# Altium PCB NB2DSK01.PcbDoc (part 4 of 17)
Units mil, origin at the board's own origin, x right, y up, seen from the top; angles counter-clockwise.
Board outline 11815 x 6500.03 mil, 8 copper layers (Top Layer, MidLayer1, MidLayer2, GND, PWR, MidLayer3, MidLayer4, Bottom Layer), stack 74.62 mil thick; 798 components, 1002 nets, 3927 pads, 3182 vias.
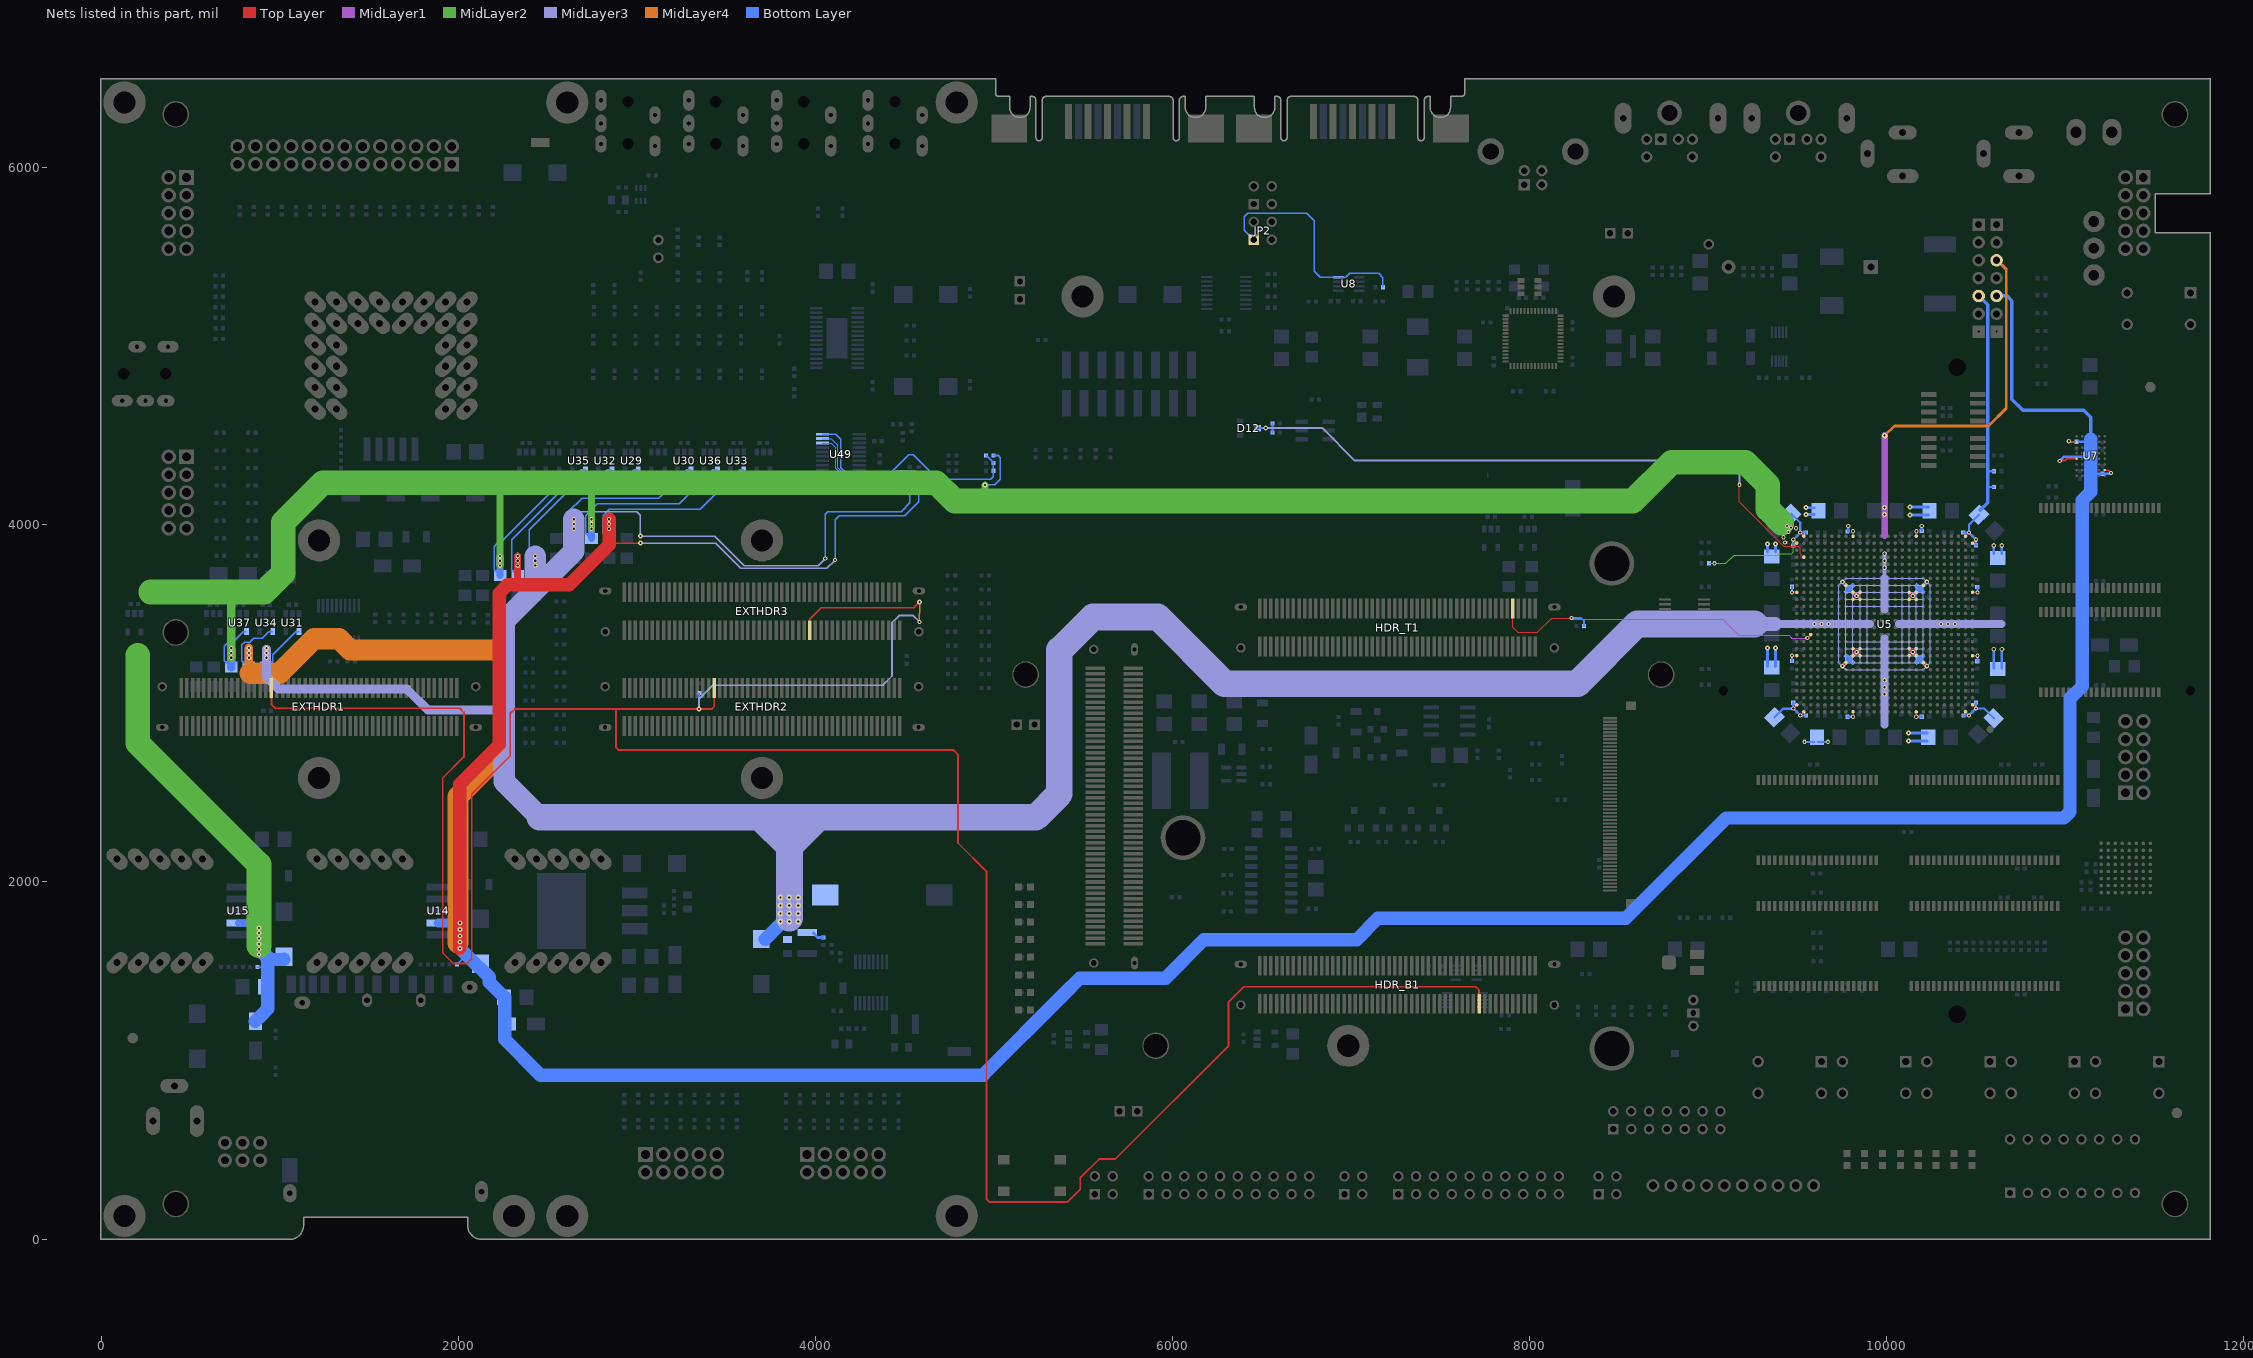
[diagram p10: the nets of this part, all layers, seen from the top]

## Part data
"Altium Logo BOT1" "Altium Logo Top1": library part D-000-0003, "Altium Logo for PCB"
BT1: library part D-302-0000, "Lithium Battery Holder for CR2032 3V Cell"
C1 C2 C3 C4 C137 C150 C160 C164 C168 C177 C180: library part D-101-0088, "Capacitor, Tantalum, 220uF 10% 10V MCCT-D (7343-31)"
C5 C6 C7 C8 C118: library part D-101-0078, "Capacitor, Ceramic, 100pF 5% 50V 0402 (1005) COG"
C9 C11 C14 C17 C26 C27 C28 C29 C38 C39 C40 C41 C42 C58 C59 C60 C61 C62 C63 C64 C65 C66 C67 C68 C69 C70 C71 C72 C73 C74 C75 C76 C77 C78 C79 C80 C81 C82 C83 C84 C115 C117 C119 C120 C121 C122 C125 C126 C127 C129 C134 C141 C153 C154 C155 C156 C174 C194 C195 C196 C198 C200 C202 C203 C204 C205 C206 C211 C212 C216 C219 C220 C221 C222 C227 C228 C229 C230 C235 C236 C237 C238 C239 C240 C241 C242 C243 C244 C245 C246 C247 C248 C249 C250 C251 C252 C253 C254 C255 C256 C257 C258 C259 C260 C261 C262 C263 C264 C265 C267 C268 C272: library part D-101-0080, "Capacitor, Ceramic, 0.1uF 10% 16V 0402 (1005) X7R"
C10 C15 C16 C18 C19 C20 C21 C22 C23 C24 C25 C34 C35 C36 C37 C54 C55 C56 C57 C114 C116 C123 C124 C132 C133 C135 C136 C140 C143 C158 C159 C162 C163 C166 C167 C169 C170 C193 C217 C218 C266 C273: library part D-101-0007, "Capacitor, Tantalum, 10uF 10% 20V MCCT-B (3528)"
C12 C13: library part D-101-0075, "Capacitor, Ceramic, 15pF 5% 50V 0402 (1005)"
C30 C31 C32 C33 C43 C44 C45 C46 C47 C48 C49 C50 C51 C52 C53 C85 C86 C87 C88 C89 C90 C91 C92 C93 C94 C95 C96 C97 C98 C99 C100 C101 C102 C103 C104 C105 C106 C107 C108 C109 C110 C111 C112 C113 C199 C201 C207 C208 C209 C210 C213 C214 C215 C223 C224 C225 C226 C231 C232 C233 C234: library part D-101-0077, "Capacitor, Ceramic, 10nF 10% 16V 0402 (1005) X7R"
C128 C130 C131 C139 C144 C151 C157 C161 C165: library part D-101-0027, "Capacitor, Ceramic, 1uF 10% 25V 1206 (3216) X7R"
C138 C142 C146 C148 C152 C197: library part D-101-0087, "Capacitor, Ceramic, 10uF 10% 10V 0805 (2012) X5R"
C145: library part D-101-0069, "Capacitor, Ceramic, 470pF 5% 50V 0402 (1005) COG"
C147 C149: library part D-101-0021, "Capacitor, Ceramic, 22uF -20%/+80% 10V 1210 (3225) Y5V"
C171 C173 C175 C176 C178 C179 C182 C183 C184 C185 C186 C187 C188 C190 C191 C192: library part D-101-0082, "Capacitor, Ceramic, 1uF 10% 6.3V 0402 (1005) X5R"
C172 C181 C189: library part D-101-0070, "Capacitor, Ceramic, 4.7nF 10% 25V 0402 (1005) X7R"
C269 C270: library part D-101-0059, "Capacitor, Ceramic, 22pF 5% 50V 0402 (1005) COG"
C271: library part D-101-0019, "Capacitor, Ceramic, 4.7nF 20% 250V Panasonic BC J Lead (CAPM7163) Y5V"
D1: library part D-150-0001, "Zener Diode, 5V 5W"
D2: library part D-150-0002, "Zener Diode, 7.5V 35mA"
D3: library part D-151-0001, "Schottky Diode, Dual-Serial, BAT54S 30V 200mA"
D4 D5 D6 D7 D8 D9 D10 D11: library part D-151-0000, "Schottky Diode, 3A 40V"
D12: library part D-150-0005, "Zener Diode, 3.3V"
DH1 DH2 HDR1 HDR2 HDR3: library part D-300-0014, "Header IDC, 2 x 5 Pin Right-Angle 2.54mm Pitch (Boxed-Male)"
EXTHDR1 EXTHDR2 EXTHDR3 HDR_B1 HDR_L1 HDR_T1: library part D-300-0026, "Connector, Molex Docking Station 100 Pin Female 53751"
F1: library part D-106-0002, "Mutifuse, SMD 8A"
F2 F3 F4 F5: library part D-106-0001, "Multifuse, SMD 1206, 350mA"
FD1 FD2 FD3: library part D-004-0001, "Fiducial - Round 1.5mm Top-Bottom"
FP1: library part "Generic No Pins"
GP1 GP2 GP3 GP4: library part D-300-0020, "Header IDC, 2 x 1 Pin Vertical 2.54mm Pitch (Non-Boxed, Male)"
HDR4: library part D-300-0022, "Header IDC, 2 x 5 Pin Right-Angle 2.54mm Pitch (Non-Boxed, Male)"
HDR5: library part D-300-0024, "Header IDC, 2 x 5 Pin Right-Angle 2.54mm Pitch (Non-Boxed, Male)"
HDR6: library part D-300-0015, "Header IDC, 2 x 13 Pin Right-Angle 2.54mm Pitch (Boxed-Male)"
HDR7: library part D-300-0017, "Header IDC, 2 x 7 Pin Vertical 2.54mm Pitch (Non-Boxed, Male)"
J1 J2 J3: library part D-300-0007, "Connector, 3 Conductor Power Jack 2 break 2 aux contacts"
J4: library part D-300-0000, "Connector, USB B Type, Right Angle, Thru Hole, White"
J5: library part D-300-0036, "MINI DIN R/A F/SHLD 6P GOLD PLATED--PURPLE PC99 RoHS Compliant"
J6: library part D-300-0037, "MINI-DIN R/A F/SHLD 6P GOLD PLATED--GREEN PC99 RoHS Compliant"
J7 J9: library part D-300-0060, "Connector DB9 SMD Male/Pins; SUYIN"
J8: library part D-300-0003, "Secure Digital Card Socket"
J10 J14: library part D-300-0033, "Connector, 3.5mm Stereo Audio Socket, Black, 2 break contacts (normals) and 2 auxiliary make contacts"
J11: library part D-300-0030, "Connector, 3.5mm Stereo Audio Socket, Red, 2 break contacts (normals) and 2 auxiliary make contacts"
J12: library part D-300-0031, "Connector, 3.5mm Stereo Audio Socket, Green, 2 break contacts (normals) and 2 auxiliary make contacts"
J13: library part D-300-0032, "Connector, 3.5mm Stereo Audio Socket, Blue, 2 break contacts (normals) and 2 auxiliary make contacts"
J15: library part D-300-0061, "Header, 2x8, 0.1\", Straight, SMT"
JP1 JP2 JP3 JP4 JP5: library part D-300-0019, "Header IDC, 2 x 2 Pin Vertical 2.54mm Pitch (Non-Boxed, Male)"
L1: library part D-102-0001, "Inductor, Magnetic Core 10uH 2.3A 70mR INDP7575"
L2: library part D-102-0000, "Inductor, 2.2uH 9A 6.8mR 20% INDP182140 SB18062R2MSB"
LCD1: library part D-300-0010, "Connector, 1 x 50 Pin, 0.5mm Pitch for Hitachi TX09D50VM1CAA TFT"
LED1 LED2 LED3 LED4 LED5 LED6 LED7 LED8: library part D-153-0009, "LED, Red 0603 (1608) 63mCd"
LED9 LED10 LED11 LED12 LED13 LED14 LED15 LED16: library part D-153-0002
LOGO1 LOGO2: library part D-000-0000
MH1 MH2 MH3 MH4 MH5 MH6 MH7 MH8: library part D-001-0001, "Mounting Hole, M3 Screw, Plated, Square Pad"
NT1 NT5: library part D-002-0003, "Net-Tie, Surface Mount, 2 x 1.6mm x 0.8mm SMT Pads - For 0.8mm Track"
NT2: library part D-002-0006, "Net-Tie, Surface Mount, 2 x 0.8mm x 0.4mm SMT Pads - For 0.4mm Track"
NT3 NT6: library part D-002-0002, "Net-Tie, Surface Mount, 2 x 0.4mm x 0.2mm SMT Pads - For 0.2mm Track"
NT4: library part D-002-0004, "Net-Tie, Surface Mount, 2 x 2.0mm x 0.8mm SMT Pads - For 0.8mm Track"
PB_MH1 PB_MH2 PB_MH3 PB_MH4 PB_MH5 PB_MH6 PB_MH7 PB_MH8 PB_MH9 PB_MH10 PB_MH11 PB_MH12 PB_MH13 PB_MH14: library part D-001-0006, "Mounting Hole for Solder Standoff, M3 Screw, Plated, Round Pad"
Q1 Q2 Q3 Q4: library part D-152-0001, "Transistor, FMMT491A Small Signal NPN"
R1 R6 R7 R11 R12 R13 R14 R19 R52 R56 R82 R83 R84 R85 R88 R89 R145 R146 R147 R148 R149 R150 R151 R152 R153 R154 R155 R156 R157 R158 R159 R190 R191 R192 R193 R198 R199 R200 R201 R206 R208 R209 R210 R211 R216 R217 R218 R219 R224 R226 R227 R228 R229 R234 R235 R236 R237 R242 R244 R245 R246 R247 R252 R253 R254 R255 R260 R262 R263 R264 R265 R270 R271 R272 R273 R278 R280 R281 R282 R283 R288 R289 R290 R291 R297 R298 R299 R300 R304 R314 R316 R318 R319: library part D-100-0088, "Resistor, 4K7 1% 0402 (1005)"
R2 R50 R51 R315: library part D-100-0108, "Resistor, 27R 1% 0402 (1005)"
R3 R4 R10 R17 R62: library part D-100-0085, "Resistor, 5R6 1% 0402 (1005)"
R5 R34 R39 R43 R48 R49 R77 R122 R123 R127 R130 R161 R296 R302 R303 R309: library part D-100-0121, "Resistor, 1K 1% 0402 (1005)"
R8 R9 R15 R16 R25 R26 R27 R28 R29 R30 R31 R32 R33 R35 R37 R38 R71 R72 R86 R87 R90 R91 R194 R195 R196 R197 R202 R203 R204 R205 R207 R212 R213 R214 R215 R220 R221 R222 R223 R225 R230 R231 R232 R233 R238 R239 R240 R241 R243 R248 R249 R250 R251 R256 R257 R258 R259 R261 R266 R267 R268 R269 R274 R275 R276 R277 R279 R284 R285 R286 R287 R292 R293 R294 R295 R301 R305 R306 R307 R308: library part D-100-0131, "Resistor, 100R 1% 0402 (1005)"
R18 R20 R131 R132 R136 R142 R143 R144: library part D-100-0107, "Resistor, 2K2 1% 0402 (1005)"
R21 R22 R23 R24 R36 R61: library part D-100-0090, "Resistor, 47R 1% 0402 (1005)"
R40 R42 R47 R109 R112 R113 R114 R115 R121 R124 R125 R126 R129 R133 R134: library part D-100-0092, "Resistor, 47K 1% 0402 (1005)"
R41: library part D-100-0097, "Resistor, 3K9 1% 0402 (1005)"
R44 R312: library part D-100-0086, "Resistor, 5K6 1% 0402 (1005)"
R45 R46 R55 R81: library part D-100-0125, "Resistor, 15K 1% 0402 (1005)"
R53 R92 R93 R94 R95 R96 R97 R98 R99 R100 R101 R102 R103 R104 R105 R106 R107: library part D-100-0111, "Resistor, 270R 1% 0402 (1005)"
R54 R60 R138 R139 R140 R141 R189 R320: library part D-100-0126, "Resistor, 120R 1% 0402 (1005)"
R57 R135: library part D-100-0115, "Resistor, 220R 1% 0402 (1005)"
R58 R59 R67 R70 R184 R185 R187 R311: library part D-100-0105, "Resistor, 2K7 1% 0402 (1005)"
R63 R69 R110 R111 R118 R119: library part D-100-0132, "Resistor, 100K 1% 0402 (1005)"
R64: library part D-100-0074, "Resistor, 8K2 1% 0402 (1005)"
R65: library part D-100-0084, "Resistor, 680K 1% 0402 (1005)"
R66: library part D-100-0102, "Resistor, 33R 1% 0402 (1005)"
R68: library part D-100-0109, "Resistor, 27K 1% 0402 (1005)"
R73 R137 R160 R181 R182 R183 R186 R188 R313: library part D-100-0130, "Resistor, 10K 1% 0402 (1005)"
R74: library part D-100-0104, "Resistor, 330R 1% 0402 (1005)"
R75 R76 R78 R79 R117: library part D-100-0114, "Resistor, 22K 1% 0402 (1005)"
R80 R108 R128: library part D-100-0098, "Resistor, 3K3 1% 0402 (1005)"
R116 R120: library part D-100-0081, "Resistor, 68K 1% 0402 (1005)"
R162 R163 R164 R165 R166 R167 R168 R169 R170 R171 R172 R173 R174 R175 R176 R177 R178 R179 R180: library part D-100-0007, "Resistor, 0R047, LRC02P, SMD, 1206, Thick Film, Current Sense, 1%"
R317: library part D-100-0059, "Resistor, 10M 1%1206 (3216)"
SW1 SW2 SW3 SW4 SW5 SW9: library part D-301-0002, "Switch, DPNO Push Button Through-Hole"
SW6: library part D-301-0000, "Switch, SPDT Subminiature Toggle"
SW7: library part D-301-0003, "Switch, DIP Black 8-Way 300mil x 100mil"
SW8: library part D-301-0001, "Switch, SPNO Push Button SMD"
TP1 TP2 TP3 TP4 TP5 TP6 TP7 TP8 TP9 TP10 TP11 TP12 TP13 TP14 TP15: library part D-006-0000, "Test Point, PCB Mount with Silkscreen Box"
TS1: library part D-300-0001, "Connector, Screw Terminal Block, Green, 10-Way, 2.54mm"
U1: library part D-220-0000, "MAX1037EKA-T, 2.7V to 5.5V, Low-Power, 4-Channel, I2C, 8-Bit ADCs"
U2: library part D-206-0001, "DS1391U-33, SPI Real-Time Clock with Trickle Charger, 3.3V, 10-Pin uMax/uSOP"
U3: library part D-206-0000, "ICS307-02, SPI Programmable Clock Generator"
U4: library part D-222-0001, "MAX5841MEUB, Quad, 10-Bit, Low-Power, I2C, DAC"
U5: library part D-241-0001, "FPGA, Xilinx Spartan3-1500 FG676 Speed=4"
U6: library part D-202-0001, "AD7843ARU,12-bit SPI Touch Screen Digitizer"
U7: library part D-262-0000, "XCF00P Series, Platform Flash In-System Programmable Configuration 1.8V PROM, 48 Ball BGA, 8-Megabit, Commercial Grade"
U8: library part D-221-0007, "MAX3051EKA-T High-Speed CAN Transceiver SOT23-8"
U9: library part D-204-0000, "LM317LDR2, 3-Terminal Adjustable Regulator"
U10: library part D-204-0004, "LM1084IS-ADJ, 5A Low Dropout Positive Regulators"
U11: library part D-204-0003, "LM2704MF, Micropower Step-up DC/DC Converter, 550mA Peak Current Limit, 2.2-7V Input, 20V Max Output"
U12: library part D-204-0002, "MAX1831EEE, 3A, 1MHz, Low-Voltage, Step-Down Regulators with Synchronous Rectification and Internal Switches"
U13: library part D-221-0002, "MAX3232EUE, 3.0V to 5.5V, Low-Power, up to 1Mbps, True RS-232 Transceivers Using Four 0.1µF External Capacitors"
U14 U15 U16: library part D-204-0014, "TPS75501KTTT, 5A, Low Dropout, Adjustable, Linear Voltage Regulator, TO-263"
U17: library part D-201-0002, "LM4849MH Stereo 2W Audio Power Amplifier with DC Volume Control and Input Mux"
U18: library part D-201-0004, "MAX9812L, Microphone Pre-Amplifier, single, 20dB gain, Shutdown"
U19: library part D-263-0002, "Dual Addressable Switch Plus 1KB Memory"
U20 U21: library part D-262-0006
U22 U23 U27 U28: library part D-260-0000, "K6R4016V1D-TC10T, 256K x 16-Bit SRAM, TSOP44"
U24: library part D-262-0001, "S29GL256N11FFIV10, 256 Megabit (16M x 16) 3.0V Page Mode Flash Memory"
U25 U26: library part D-261-0000, "MT48LC16M16A2TG, 256 Mbit High-Speed CMOS SDRAM, 16Mb x 16Bit x 4 Banks, TSOP54"
U29 U30 U31 U32 U33 U34 U35 U36 U37 U38 U39 U40 U41 U42 U43 U44 U45 U46 U47: library part D-204-0012, "MAX4372 High Side Current Sense Amplifier"
U48 U49: library part D-220-0003, "MAX1229, 12bit ADC, 12 channel, 3.3V, SPI"
U50: library part D-243-0000, "MAX6315, Open-Drain Output SOT Reset IC, Customized Reset Thresholds, Timeout Delays"
U51: library part D-204-0001, "NUP2201MR6, Low Capacitance Diode Array, USB Protection"
U52: library part D-221-0004, "CY7C68001-56LFC, EZ-USB SX2 High-Speed USB Interface"
UH1 UH2: library part D-300-0021, "Header IDC, 2 x 10 Pin Vertical 2.54mm Pitch (Non-Boxed, Male)"
VR1: library part D-105-0000, "Potentiometer, 20K 4mm Cermet PCB SMT Trimmer"
VR2: library part D-105-0001, "Potentiometer, 2 x 5K Linear 9mm PCB Mount Fluted Shaft"
Y1: library part D-103-0002, "Crystal, 32.768 KHz Surface Mount"
Y2: library part D-103-0012, "Crystal, SMD, 20.000000MHz Stab=30ppm 20.0pF"
Y3: library part D-103-0013, "Crystal, SMD, 24.000000MHz Stab=30ppm 20.0pF"

## Free pads (board coordinates)
  oval 137.8x78.74 hole 39.37 slot 98.43 at 45 deg rot 45 paste+0 mask+0: 0(88.68,1548.45) 0(208.68,1548.45) 0(328.68,1548.45) 0(448.68,1548.45) 0(568.68,1548.45) 0(1208.68,1548.45) 0(1328.68,1548.45) 0(1448.68,1548.45) 0(1568.68,1548.45) 0(1688.68,1548.45) 0(1688.68,5128.45) 0(1688.68,5248.45) 0(1808.68,5128.45) 0(1808.68,5248.45) 0(1928.68,4648.45) 0(1928.68,4768.45) 0(1928.68,4888.45) 0(1928.68,5008.45) 0(1928.68,5128.45) 0(1928.68,5248.45) 0(2048.68,4648.45) 0(2048.68,4768.45) 0(2048.68,4888.45) 0(2048.68,5008.45) 0(2048.68,5128.45) 0(2048.68,5248.45) 0(2318.68,1548.45) 0(2438.68,1548.45) 0(2558.68,1548.45) 0(2678.68,1548.45) 0(2798.68,1548.45)
  oval 137.8x78.74 hole 39.37 slot 98.43 at 135 deg rot 135 paste+0 mask+0: 0(88.68,2128.45) 0(208.68,2128.45) 0(328.68,2128.45) 0(448.68,2128.45) 0(568.68,2128.45) 0(1198.68,4648.45) 0(1198.68,4768.45) 0(1198.68,4888.45) 0(1198.68,5008.45) 0(1198.68,5128.45) 0(1198.68,5248.45) 0(1208.68,2128.45) 0(1318.68,4648.45) 0(1318.68,4768.45) 0(1318.68,4888.45) 0(1318.68,5008.45) 0(1318.68,5128.45) 0(1318.68,5248.45) 0(1328.68,2128.45) 0(1438.68,5128.45) 0(1438.68,5248.45) 0(1448.68,2128.45) 0(1558.68,5128.45) 0(1558.68,5248.45) 0(1568.68,2128.45) 0(1688.68,2128.45) 0(2318.68,2128.45) 0(2438.68,2128.45) 0(2558.68,2128.45) 0(2678.68,2128.45) 0(2798.68,2128.45)
  rect 118.11x225 smd far side: 0(4120.08,5045.28)
  rect 70x50 hole 31.5: 0(8916.89,1266.02)
  rect 70x70 hole 11.81 mask+0: 0(10514.96,5081.98) 0(10614.96,5081.98)
  rect 70x70 hole 39.37: 0(10514.96,5681.95) 0(10614.96,5681.95)
  round 157.48 on Plane1: 2(177.17,1125.98) 2(11579.68,5072.45) 2(11624.68,706.45)
  round 157.48 on Plane2: 2(177.17,1125.98) 2(11579.68,5072.45) 2(11624.68,706.45)

## Via types
v1: diameter 23.62, hole 11.81, Top Layer to Bottom Layer, tented both sides, 1950 vias
v2: diameter 27.56, hole 11.81, Top Layer to Bottom Layer, tented both sides, 679 vias
v3: diameter 23.62, hole 11.81, Top Layer to Bottom Layer, 194 vias
v4: diameter 31.5, hole 11.81, Top Layer to Bottom Layer, tented both sides, 178 vias
v5: diameter 21.65, hole 11.81, Top Layer to Bottom Layer, tented both sides, 67 vias
v6: diameter 23.62, hole 11.81, Top Layer to Bottom Layer, tented bottom, 53 vias
v7: diameter 26, hole 11.81, Top Layer to Bottom Layer, tented both sides, 21 vias
v8: diameter 26, hole 11.81, Top Layer to Bottom Layer, 13 vias
v9: diameter 28, hole 11.81, Top Layer to Bottom Layer, 8 vias
v10: diameter 25.59, hole 11.81, Top Layer to Bottom Layer, tented both sides, 7 vias
v11: diameter 39.37, hole 11.81, Top Layer to Bottom Layer, tented both sides, 5 vias
v12: diameter 30, hole 11.81, Top Layer to Bottom Layer, 3 vias
v13: diameter 30, hole 11.81, Top Layer to Bottom Layer, tented both sides, 2 vias
v14: diameter 23, hole 11.81, Top Layer to Bottom Layer, tented both sides, 1 vias
v15: diameter 26.56, hole 11.81, Top Layer to Bottom Layer, tented both sides, 1 vias

## Nets (pads, with @x,y where several pads share a name; then routed paths per layer and width w, separated by ;. In a path a pad name is that pad's centre, name@x,y a point inside that pad or via, vN(x,y) a via of type N, cw(c..) or ccw(c..) an arc to the next point about the centre after c; other vN are vias at no path point)
1MBPS_EN: JP2.1 R55.2 U8.8 | length 1322.3
  Bottom Layer w7.87: JP2.1@6455.12,5596.85 6401,5650.97 6401,5726 6420,5745 6751,5745 6793.84,5702.16 6793.84,5421.16 6827.13,5387.87 U8.8@6927,5387.87 6971.2,5387.87 6992.47,5409.13 7153.87,5409.13 7178.65,5384.35 R55.2@7178.65,5330.7
1V2: C18.1 C19.1 C20.1 C21.1 C22.1 C23.1 C24.1 C25.1 C26.1 C27.1 C28.1 C29.1 C30.1 C31.1 C32.1 C33.1 C148.2 C149.2 C150.1 L2.2 R67.2 R162.1 R163.1 R164.1 R184.2 TP9.1 U5.H8 U5.H19 U5.J9 U5.J10 U5.J17 U5.J18 U5.K9 U5.K10 U5.K17 U5.K18 U5.U9 U5.U10 U5.U17 U5.U18 U5.V9 U5.V10 U5.V17 U5.V18 U5.W8 U5.W19 U29.4 U30.4 U31.4 | length 33374.5
  Top Layer w7.87: v10(9751.97,3208.66) U5.W8@9771.65,3228.35 ; v10(9751.97,3681.1) U5.H8@9771.65,3661.42 ; U5.V9@9811.02,3267.72 v10(9830.71,3287.4) ; U5.U9@9811.02,3307.09 v10(9830.71,3287.4) ; U5.K9@9811.02,3582.68 v10(9830.71,3602.36) ; U5.J9@9811.02,3622.05 v10(9830.71,3602.36) ; U5.V10@9850.39,3267.72 v10(9830.71,3287.4) ; U5.U10@9850.39,3307.09 v10(9830.71,3287.4) ; U5.K10@9850.39,3582.68 v10(9830.71,3602.36) ; U5.J10@9850.39,3622.05 v10(9830.71,3602.36) ; U5.V17@10125.98,3267.72 v10(10145.67,3287.4) ; U5.U17@10125.98,3307.09 v10(10145.67,3287.4) ; U5.K17@10125.98,3582.68 v10(10145.67,3602.36) ; U5.J17@10125.98,3622.05 v10(10145.67,3602.36) ; U5.V18@10165.35,3267.72 v10(10145.67,3287.4) ; U5.U18@10165.35,3307.09 v10(10145.67,3287.4) ; U5.K18@10165.35,3582.68 v10(10145.67,3602.36) ; U5.J18@10165.35,3622.05 v10(10145.67,3602.36) ; U5.W19@10204.72,3228.35 v1(10224.41,3208.66) ; U5.H19@10204.72,3661.42 v10(10224.41,3681.1)
  MidLayer1 w38: 9988.19,3940.95 v2(9988.19,4059.06) v2(9988.19,4098.43) v4(9988.19,4500)
  MidLayer4 w15.75: v4(9988.19,4500) 10042.64,4554.45 10570.2,4554.45 10669.29,4653.54 10669.29,5431.62 10616.94,5483.97 TP9.1@10614.94,5485.97
  MidLayer3 w5: 9732.07,3438.69 9732.07,3228.56 v10(9751.97,3208.66) ; 9732.07,3451.07 9732.07,3661.21 v10(9751.97,3681.1) ; 9771.44,3228.56 9771.44,3438.69 ; 9771.44,3451.07 9771.44,3661.21 ; 9771.87,3267.93 9810.81,3267.93 ; 9771.87,3307.3 9810.81,3307.3 ; 9771.87,3346.67 9810.81,3346.67 ; 9771.87,3543.1 9810.81,3543.1 ; 9771.87,3582.47 9810.81,3582.47 ; 9771.87,3621.84 9810.81,3621.84 ; 9810.81,3438.69 9810.81,3346.67 ; 9810.81,3451.07 9810.81,3543.1 ; 9850.18,3438.69 9850.18,3346.67 ; 9850.18,3451.07 9850.18,3543.1 ; 9889.55,3438.69 9889.55,3346.67 ; 9889.55,3451.07 9889.55,3543.1 ; 9982,3188.76 9771.87,3188.76 v10(9751.97,3208.66) ; 9982,3228.56 9889.55,3228.56 ; 9982,3267.93 9889.55,3267.93 ; 9982,3307.3 9889.55,3307.3 ; 9982,3346.67 9889.55,3346.67 ; 9982,3543.1 9889.55,3543.1 ; 9982,3582.47 9889.55,3582.47 ; 9982,3621.84 9889.55,3621.84 ; 9982,3661.21 9889.55,3661.21 ; 9982,3701 9771.87,3701 v10(9751.97,3681.1) ; 9994.38,3188.76 10204.51,3188.76 v1(10224.41,3208.66) ; 9994.38,3228.56 10086.83,3228.56 ; 9994.38,3267.93 10086.83,3267.93 ; 9994.38,3307.3 10086.83,3307.3 ; 9994.38,3346.67 10086.83,3346.67 ; 9994.38,3543.1 10086.83,3543.1 ; 9994.38,3582.47 10086.83,3582.47 ; 9994.38,3621.84 10086.83,3621.84 ; 9994.38,3661.21 10086.83,3661.21 ; 9994.38,3701 10204.51,3701 v10(10224.41,3681.1) ; 10086.83,3438.69 10086.83,3346.67 ; 10086.83,3451.07 10086.83,3543.1 ; 10126.2,3438.69 10126.2,3346.67 ; 10126.2,3451.07 10126.2,3543.1 ; 10165.57,3438.69 10165.57,3346.67 ; 10165.57,3451.07 10165.57,3543.1 ; 10204.51,3267.93 10165.57,3267.93 ; 10204.51,3307.3 10165.57,3307.3 ; 10204.51,3346.67 10165.57,3346.67 ; 10204.51,3543.1 10165.57,3543.1 ; 10204.51,3582.47 10165.57,3582.47 ; 10204.51,3621.84 10165.57,3621.84 ; 10204.94,3228.56 10204.94,3438.69 ; 10204.94,3451.07 10204.94,3661.21 ; 10244.31,3438.69 10244.31,3228.56 v1(10224.41,3208.66) ; 10244.31,3451.07 10244.31,3661.21 v10(10224.41,3681.1) ; v10(9751.97,3208.66) 9771.87,3228.56 9810.81,3228.56 ; v10(9751.97,3681.1) 9771.87,3661.21 9810.81,3661.21 ; 9810.81,3228.56 9850.18,3228.56 ; 9810.81,3228.56 9810.81,3267.93 ; 9810.81,3267.93 9850.18,3267.93 ; 9810.81,3267.93 9810.81,3307.3 ; 9810.81,3307.3 9810.81,3346.67 ; 9810.81,3307.3 9850.18,3307.3 ; 9810.81,3346.67 9850.18,3346.67 ; 9810.81,3543.1 9850.18,3543.1 ; 9810.81,3543.1 9810.81,3582.47 ; 9810.81,3582.47 9850.18,3582.47 ; 9810.81,3582.47 9810.81,3621.84 ; 9810.81,3621.84 9850.18,3621.84 ; 9810.81,3621.84 9810.81,3661.21 ; 9810.81,3661.21 9850.18,3661.21 ; 9850.18,3228.56 9889.55,3228.56 ; 9850.18,3228.56 9850.18,3267.93 ; 9850.18,3267.93 9889.55,3267.93 ; 9850.18,3267.93 9850.18,3307.3 ; 9850.18,3307.3 9889.55,3307.3 ; 9850.18,3307.3 9850.18,3346.67 ; 9850.18,3346.67 9889.55,3346.67 ; 9850.18,3543.1 9850.18,3582.47 ; 9850.18,3543.1 9889.55,3543.1 ; 9850.18,3582.47 9850.18,3621.84 ; 9850.18,3582.47 9889.55,3582.47 ; 9850.18,3621.84 9850.18,3661.21 ; 9850.18,3621.84 9889.55,3621.84 ; 9850.18,3661.21 9889.55,3661.21 ; 9889.55,3228.56 9889.55,3267.93 ; 9889.55,3267.93 9889.55,3307.3 ; 9889.55,3307.3 9889.55,3346.67 ; 9889.55,3543.1 9889.55,3582.47 ; 9889.55,3582.47 9889.55,3621.84 ; 9889.55,3621.84 9889.55,3661.21 ; 10086.83,3228.56 10086.83,3267.93 ; 10086.83,3228.56 10126.2,3228.56 ; 10086.83,3267.93 10086.83,3307.3 ; 10086.83,3267.93 10126.2,3267.93 ; 10086.83,3307.3 10086.83,3346.67 ; 10086.83,3307.3 10126.2,3307.3 ; 10086.83,3346.67 10126.2,3346.67 ; 10086.83,3543.1 10086.83,3582.47 ; 10086.83,3543.1 10126.2,3543.1 ; 10086.83,3582.47 10086.83,3621.84 ; 10086.83,3582.47 10126.2,3582.47 ; 10086.83,3621.84 10086.83,3661.21 ; 10086.83,3621.84 10126.2,3621.84 ; 10086.83,3661.21 10126.2,3661.21 ; 10126.2,3228.56 10126.2,3267.93 ; 10126.2,3228.56 10165.57,3228.56 ; 10126.2,3267.93 10126.2,3307.3 ; 10126.2,3267.93 10165.57,3267.93 ; 10126.2,3307.3 10126.2,3346.67 ; 10126.2,3307.3 10165.57,3307.3 ; 10126.2,3346.67 10165.57,3346.67 ; 10126.2,3543.1 10126.2,3582.47 ; 10126.2,3543.1 10165.57,3543.1 ; 10126.2,3582.47 10126.2,3621.84 ; 10126.2,3582.47 10165.57,3582.47 ; 10126.2,3621.84 10126.2,3661.21 ; 10126.2,3621.84 10165.57,3621.84 ; 10126.2,3661.21 10165.57,3661.21 ; 10165.57,3228.56 10204.51,3228.56 v1(10224.41,3208.66) ; 10165.57,3228.56 10165.57,3267.93 ; 10165.57,3267.93 10165.57,3307.3 ; 10165.57,3307.3 10165.57,3346.67 ; 10165.57,3543.1 10165.57,3582.47 ; 10165.57,3582.47 10165.57,3621.84 ; 10165.57,3621.84 10165.57,3661.21 ; 10165.57,3661.21 10204.51,3661.21 v10(10224.41,3681.1)
  MidLayer3 w7.87: v1(2647.64,4031.5) 2690.94,4074.8 3000,4074.8 3019.69,4055.12 v2(3019.69,3937.01) 3437.01,3937.01 3602.36,3771.65 4015.75,3771.65 v1(4055.12,3811.02)
  MidLayer3 w22: 9988.19,3701.96 v1(9988.19,3759.84) v1(9988.19,3799.21) v1(9988.19,3838.58)
  MidLayer3 w44: 9988,2881 9988.07,3051.18 9988.08,3090.55 v1(9988.19,3129.92) 9988.19,3363.94
  MidLayer3 w45: 9338.58,3444.88 v1(9594.49,3444.88) v1(9633.86,3444.88) v1(9673.23,3444.88) 9907.11,3444.88 ; 9988.19,3526.96 9988.19,3701.96 ; 10068.11,3444.88 v1(10303.15,3444.88) v1(10342.52,3444.88) v1(10381.89,3444.88) 10641.73,3444.88
  MidLayer3 w50: v2@925.2,3303.15 v2(925.2,3283.46) v2(925.2,3255.91) 925.2,3149.61 994.09,3080.71 1712.6,3080.71 1830.71,2962.6 2230.32,2962.6
  MidLayer3 w78.74: 9157.48,3444.88 9374.02,3444.88
  MidLayer3 w120: 2431.1,3663.69 v1(2431.1,3771.65) v1(2431.1,3799.21) v1(2431.1,3824.8) ; 2456.69,2362.21 2257,2561.9 2257,3461.72 2647.64,3852.36 v1(2647.64,3978.35) v1(2647.64,4005.91) v1(2647.64,4031.5)
  MidLayer3 w149.61: 2456.69,2362.21 3690.97,2362.21 ; 3854.72,1798.45 3854.72,1823.45 3854.72,1868.45 3854.72,1913.45 3854.72,2198.45 ; 5366.14,3299.21 5366.14,2909.45 5366.14,2494.14 5234.21,2362.21 4818.9,2362.21 4018.48,2362.21 ; 5370.08,3299.21 5555.12,3484.25 5917.32,3484.25 6291.34,3110.24 8267.72,3110.24 8602.36,3444.88 9259.84,3444.88 ; 3690.97,2362.21 3854.72,2198.45 ; 3690.97,2362.21 3854.72,2362.21 ; 3854.72,2198.45 3854.72,2362.21 ; 3854.72,2198.45 4018.48,2362.21 ; 3854.72,2362.21 4018.48,2362.21
  Bottom Layer w7.87: R164.1@925.2,3200.79 927.17,3202.76 960.63,3236.22 960.63,3271.65 1090.91,3401.94 U31.4@1108.46,3401.94 ; R162.1@2429.13,3716.54 2397.64,3748.03 2397.64,3972.44 2637.8,4212.6 2889.76,4212.6 2984.61,4307.45 U29.4@3008.07,4307.45 ; R163.1@2641.73,3925.2 2614.17,3952.76 2614.17,4070.87 2692.91,4149.61 3122.05,4149.61 3279.89,4307.45 U30.4@3303.35,4307.45 ; v1(4055.12,3811.02) 4055.12,4060.12 4069.8,4074.8 4480.31,4074.8 4528.77,4123.26 R184.2@4528.77,4186.13
  Bottom Layer w12: v1(9539.88,2785) C24.1@9595,2785 ; C24.1@9615,2785 v1(9670.12,2785)
  Bottom Layer w15: C149.2@3988.68,1713.45 4012.5,1689.63 R67.2@4043.68,1689.63
  Bottom Layer w15.75: C23.1@9332.73,3206.56 v2(9332.73,3311.56) ; C25.1@9332.73,3847.49 v2(9332.73,3892.49) ; C23.1@9377.73,3206.56 v2(9377.73,3311.56) ; C25.1@9377.73,3847.49 v2(9377.73,3892.49) ; v2(9548.46,4096.32) C21.1@9593.46,4096.32 ; v2(9548.51,4057.41) C21.1@9593.51,4057.41 ; v2(10121.57,2789.42) C22.1@10226.57,2789.42 ; v2(10121.57,2834.42) C22.1@10226.57,2834.42 ; v2(10129.45,4055.87) C20.1@10234.45,4055.87 ; v2(10129.45,4100.87) C20.1@10234.45,4100.87 ; C18.1@10599.17,3839.63 v2(10599.17,3884.63) ; C19.1@10599.19,3198.69 v2(10599.19,3303.69) ; C18.1@10644.17,3839.63 v2(10644.17,3884.63) ; C19.1@10644.19,3198.69 v2(10644.19,3303.69)
  Bottom Layer w23.62: v10(9751.97,3208.66) 9791.34,3248.03 ; v10(9751.97,3681.1) 9791.34,3641.73 ; C32.1@9774.46,3264.91 9791.34,3248.03 ; C29.1@9774.46,3624.85 9791.34,3641.73 ; C27.1@9808.22,3231.15 9791.34,3248.03 ; C31.1@9808.22,3658.61 9791.34,3641.73 ; v10(9830.71,3287.4) 9791.34,3248.03 ; v10(9830.71,3602.36) 9791.34,3641.73 ; v10(10145.67,3287.4) 10185.04,3248.03 ; v10(10145.67,3602.36) 10185.04,3641.73 ; C30.1@10168.16,3231.15 10185.04,3248.03 ; C33.1@10168.16,3658.61 10185.04,3641.73 ; C26.1@10201.92,3264.91 10185.04,3248.03 ; C28.1@10201.92,3624.85 10185.04,3641.73 ; v1(10224.41,3208.66) 10185.04,3248.03 ; v10(10224.41,3681.1) 10185.04,3641.73
  Bottom Layer w39.37: R162.1@2431.1,3716.54 v1(2431.1,3771.65) v1(2431.1,3799.21) v1(2431.1,3824.8) ; R163.1@2647.64,3923.23 v1(2647.64,3978.35) v1(2647.64,4005.91) v1(2647.64,4031.5)
  Bottom Layer w50: R164.1@925.2,3204.72 v2(925.2,3255.91) v2(925.2,3283.46) v2@925.2,3303.15
  Bottom Layer w75: C150.1@3719.39,1679.5 3811.01,1771.12 3833.34,1793.45
  other v1: 9988.19,3051.18 9988.19,3090.55 9830.71,3602.36
  other v2: 925.2,3311.02
  other v4: 3803.68,1778.45 3853.68,1778.45 3903.68,1778.45 3803.68,1823.45 3853.68,1823.45 3903.68,1823.45 3803.68,1868.45 3853.68,1868.45 3903.68,1868.45 3803.68,1913.45 3853.68,1913.45 3903.68,1913.45
1V2D: C261.2 R184.1 U49.8 | length 716.8
  Bottom Layer w5: U49.8@4039.37,4458.46 4088.78,4458.46 4114.17,4433.07 4114.17,4317.24 4187.85,4243.56 4403.8,4243.56 4443.7,4283.46 C261.2@4528.77,4283.46
  Bottom Layer w7.87: R184.1@4528.77,4228.49 C261.2@4528.77,4282.48
1V8: C119.2 C120.1 C159.1 C160.1 D6.1 R73.1 R165.1 R166.1 R167.1 R185.2 TP10.1 U7.B1 U7.E1 U7.G6 U14.4 U32.4 U33.4 U34.4 | length 25668.2
  Top Layer w7.87: 2844.49,3897.64 v2(3019.69,3897.64) ; v1(10968.5,4358.27) 10996.06,4358.27 11007.87,4370.08 U7.E1@11062.99,4370.08 ; v1(11019.69,4468.5) 11023.62,4464.57 U7.B1@11062.99,4464.57 ; U7.G6@11220.47,4307.09 11240.16,4307.09 v1(11255.91,4291.34)
  Top Layer w39.37: 2332.68,3671.26 v1(2332.68,3771.65) v1(2332.68,3799.21) v1(2332.68,3824.8)
  Top Layer w75: v2(2008.68,1628.45) v2(2008.68,1663.45) v2(2008.68,1698.45) v2(2008.68,1733.45) v2(2008.68,1771.52) 2008.68,2548.05 2228.35,2767.72 2228.35,3618.11 2275.59,3665.35 2622.05,3665.35 2844.49,3887.8 2844.49,3897.64 v1(2844.49,3978.35) v1(2844.49,4005.91) v1(2844.49,4031.5)
  MidLayer4 w49.21: v2(826.77,3311.02) v2(826.77,3283.46) v2(826.77,3255.91) 826.77,3177.17 834.65,3169.29
  MidLayer4 w118.11: 834.65,3169.29 1000,3169.29 1192.91,3362.2 1330.71,3362.2 1393.7,3299.21 2221.79,3299.21 2258,3263 2258,2738.32 1998.68,2479 1998.68,1771.52 1998.68,1733.45 1998.68,1698.45 1998.68,1663.45 v2@1998.68,1658.45
  MidLayer3 w7.87: v2(3019.69,3897.64) 3440.94,3897.64 3582.68,3755.91 4062.99,3755.91 v1(4110.24,3803.15)
  Bottom Layer w7.87: R167.1@811.02,3216.54 788.46,3239.09 788.46,3327.83 803.15,3342.52 830.71,3342.52 854.33,3366.14 901.57,3366.14 937.37,3401.94 U34.4@960.83,3401.94 ; R165.1@2334.65,3712.6 2331.69,3715.55 2299.21,3748.03 2299.21,3917.32 2625.98,4244.09 2771.65,4244.09 2835.01,4307.45 U32.4@2860.43,4307.45 ; R166.1@2838.58,3925.2 2811.02,3952.76 2811.02,4051.18 2846.46,4086.61 3354.33,4086.61 3575.17,4307.45 U33.4@3598.62,4307.45 ; v1(4110.24,3803.15) 4110.24,4028.24 4133.18,4051.18 4500,4051.18 4578.74,4129.92 R185.2@4578.74,4186.13 ; v1(11019.69,4468.5) 11022.64,4465.55 C119.2@11062.99,4465.55
  Bottom Layer w8: R73.1@1993.68,1538.45 1993.79,1538.56 2038.68,1583.45
  Bottom Layer w15: C119.2@11062.99,4465.55 11138.78,4465.55
  Bottom Layer w15.75: v1(10968.5,4358.27) 10992.13,4381.89 11137.8,4381.89 ; 11144.69,4286.42 C120.1@11208.66,4286.42 11250.98,4286.42 v1(11255.91,4291.34)
  Bottom Layer w19.68: TP10.1@10614.94,5281.97 10674.73,5281.97 10700.79,5255.91 10700.79,4703.21 10763,4641 11103.09,4641 11141.73,4602.36 11141.73,4480.32
  Bottom Layer w39.37: R165.1@2332.68,3716.54 v1(2332.68,3771.65) v1(2332.68,3799.21) v1(2332.68,3824.8) ; R166.1@2844.49,3923.23 v1(2844.49,3978.35) v1(2844.49,4005.91) v1(2844.49,4031.5)
  Bottom Layer w49.21: R167.1@826.77,3204.72 v2(826.77,3255.91) v2(826.77,3283.46) v2@826.77,3303.15
  Bottom Layer w50: U14.4@1888.68,1771.52 1970.61,1771.52 ; v2@1995.61,1771.52 1970.61,1771.52 ; v2(2008.68,1733.45) 1989.65,1752.49 1975.18,1766.95 1970.61,1771.52
  Bottom Layer w75: v2(2008.68,1628.45) 2109.35,1527.78 C160.1@2118.68,1518.45 ; v2@2008.68,1631.52 v2(2008.68,1663.45) v2(2008.68,1698.45) v2(2008.68,1733.45) v2@2008.68,1758.45 ; C160.1@2123.97,1517.41 2173.68,1467.7 2173.68,1439.4 2257.66,1355.42 2259.63,1353.45 2259.63,1203.45 2259.63,1118.33 2460.63,917.32 4940,917.32 4940,921 5392,1373 5481,1462 5542,1462 5960.74,1462 ; 5961,1462 5960.74,1462 ; 11141.73,4480.32 11141.73,4185.04 11094.49,4137.8 11094.49,3096.49 11026,3028 11026,2513 11026,2394 10990.27,2358.27 10760,2358.27 9240.16,2358.27 9101.1,2358.27 8538.83,1796 7149.84,1796 7030.85,1677 6175.74,1677 5960.74,1462
1V8D: C262.2 R185.1 U49.9 | length 792.5
  Bottom Layer w5: U49.9@4039.37,4483.46 4089.76,4483.46 4125.98,4447.24 4125.98,4319.57 4191.99,4253.56 4399.66,4253.56 4449.25,4303.15 4558.07,4303.15 C262.2@4578.74,4282.48
  Bottom Layer w7.87: R185.1@4578.74,4228.49 C262.2@4578.74,4282.48
1W_DBID: HDR_T1.92 R18.1 U5.R3 | length 1980.3
  Top Layer w5: HDR_T1.92@7905.51,3531.5 7905.51,3426.62 7933.68,3398.45 8043.68,3398.45 8123.68,3478.45 v5(8233.68,3478.45)
  Top Layer w7.87: v1(9555.12,3366.14) U5.R3@9574.8,3385.83
  MidLayer1 w5: v5(8233.68,3478.45) 8240.01,3472.13 9081.54,3472.13 9171.78,3381.89 9452.76,3381.89 9468.5,3366.14 v1(9555.12,3366.14)
  Bottom Layer w10: v5(8233.68,3478.45) 8288.68,3478.45 8304.86,3462.27 R18.1@8304.86,3433.45
1W_DBPB: EXTHDR1.67 EXTHDR2.67 EXTHDR3.67 HDR_B1.79 R20.2 | length 16332.5
  Top Layer w8: 974.69,2972.44 2007.87,2972.44 ; EXTHDR3.67@3968.5,3409.45 3968.5,3472.28 4032.93,3536.7 4551.93,3536.7 v2(4583.68,3568.45)
  Top Layer w10: 952.76,2994.38 974.69,2972.44 ; 953.68,2993.45 EXTHDR1.67@953.68,3085.69 ; 2007.87,2972.44 2031.5,2948.82 2031.5,2700.79 1913.39,2582.68 1913.39,1602.36 1972.44,1543.31 2047.24,1543.31 2074.8,1570.87 2074.8,2492.13 2291.34,2708.66 2291.34,2944.88 2314.91,2968.45 2883.68,2968.45 ; EXTHDR2.67@3433.07,3086.61 3433.07,2982.84 3418.68,2968.45 v2(3348.68,2968.45) 2883.68,2968.45 ; HDR_B1.79@7716.54,1318.9 7716.54,1395.6 7698.68,1413.45 6398.68,1413.45 6313.68,1328.45 6313.68,1083.45 5678.68,448.45 5588.68,448.45 5483.68,343.45 5483.68,278.45 5413.68,208.45 4973.68,208.45 4958.68,223.45 4958.68,2058.45 4798.68,2218.45 4798.68,2713.45 4773.68,2738.45 2898.68,2738.45 2883.68,2753.45 2883.68,2968.45
  MidLayer4 w8: v1(4582.68,3456.69) 4582.68,3503.94 4583.68,3504.94 v2(4583.68,3568.45)
  MidLayer3 w10: v2(3348.68,2968.45) 3348.68,3025.85 3425.2,3102.36 4377.95,3102.36 4429.13,3153.54 4429.13,3452.76 4468.5,3492.13 4547.24,3492.13 v1(4582.68,3456.69)
  Bottom Layer w10: v2(3348.68,2968.45) R20.2@3348.68,3057.27
1W_NBID: D12.2 R160.1 R161.1 U5.D2 | length 3583.4
  Top Layer w5: v1(9175.2,4224.4) 9175.2,4128.8 9424,3880 9505,3880 9515,3870 9515,3839.33 U5.D2@9535.43,3818.9
  MidLayer3 w10: v2(6522,4543) 6837.84,4543 7020.84,4360 9147.9,4360 9175.2,4332.7 v1(9175.2,4224.4)
  Bottom Layer w10: D12.2@6477.04,4542 6559.62,4542 ; R160.1@6559.62,4517.47 R161.1@6559.62,4567.47
2V5: C34.1 C35.1 C36.1 C37.1 C38.1 C39.1 C40.1 C41.1 C42.1 C43.1 C44.1 C45.1 C46.1 C47.1 C48.1 C49.1 C50.1 C51.1 C52.1 C53.1 C163.1 C164.1 D7.1 R11.1 R13.1 R14.1 R76.2 R168.1 R169.1 R170.1 R181.2 TP11.1 U5.A2 U5.A9 U5.A18 U5.A25 U5.AE1 U5.AE26 U5.AF2 U5.AF9 U5.AF18 U5.AF25 U5.B1 U5.B26 U5.J1 U5.J26 U5.V1 U5.V26 U15.4 U35.4 U36.4 U37.4 | length 20102.2
  Top Layer w5: v1(9468.5,3267.72) U5.V1@9496.06,3267.72
  Top Layer w7.87: v1(9468.5,3622.05) U5.J1@9496.06,3622.05 ; v1(9476.38,2972.44) U5.AE1@9496.06,2992.13 ; v1(9476.38,3917.32) U5.B1@9496.06,3897.64 ; v1(9515.75,2933.07) U5.AF2@9535.43,2952.76 ; v1(9515.75,3956.7) U5.A2@9535.43,3937.01 ; v1(9811.02,2925.2) U5.AF9@9811.02,2952.76 ; U5.A9@9811.02,3937.01 v14(9811.81,3964.17) ; v1(10165.35,2925.2) U5.AF18@10165.35,2952.76 ; U5.A18@10165.35,3937.01 v1(10165.75,3964.57) ; U5.AF25@10440.95,2952.76 v1(10460.63,2933.07) ; U5.A25@10440.95,3937.01 v1(10460.63,3956.7) ; U5.AE26@10480.32,2992.13 v1(10500,2972.44) ; U5.V26@10480.32,3267.72 v1(10507.87,3267.32) ; U5.J26@10480.32,3622.05 v1(10507.87,3622.05) ; U5.B26@10480.32,3897.64 v1(10500,3917.32)
  MidLayer2 w5: v1(9035.09,3784.68) 9099.59,3784.68 9144.91,3830 9389.05,3830 9398.05,3839 9467,3839 9476.38,3848.38 v1(9476.38,3917.32)
  MidLayer2 w39.37: v1(2234.25,3771.65) v1(2234.25,3799.21) v1(2234.25,3824.8) 2234.25,4236.22 2234.25,4246.06 ; v1(2746.06,3978.35) v1(2746.06,4005.91) v1(2746.06,4031.5) 2746.06,4236.22 2746.06,4246.06 ; 4948.82,4137.8 v2(4948.82,4224.41)
  MidLayer2 w49.21: v2(728.35,3255.91) v2(728.35,3283.46) v2(728.35,3311.02) 728.35,3614.17
  MidLayer2 w137.8: 204.52,3269.48 204.52,2777.61 883.68,2098.45 v2(883.68,1743.45) v2(883.68,1713.45) v2(883.68,1683.45) v2(883.68,1653.45) v2@883.68,1643.45 ; 277.54,3624 913.39,3624 1019.69,3730.3 1019.69,4015.75 1240.16,4236.22 2234.25,4236.22 2746.06,4236.22 4677.17,4236.22 4779.53,4133.86 8578.18,4133.86 8795.66,4351.34 9207.06,4351.34 9333.4,4225 9333.4,4089.2 9412.02,4010.58
  Bottom Layer w5: R11.1@9006.98,3782.17 R11.1@9004.46,3784.68 v1(9035.09,3784.68)
  Bottom Layer w7.87: R170.1@716.54,3212.6 690.04,3239.09 690.04,3319.96 712.6,3342.52 736.22,3342.52 795.64,3401.94 U37.4@813.19,3401.94 ; R168.1@2232.28,3716.54 2200.79,3748.03 2200.79,3877.95 2216.54,3893.7 2228.35,3893.7 2610.24,4275.59 2657.48,4275.59 2689.34,4307.45 U35.4@2712.8,4307.45 ; R169.1@2740.16,3925.2 2712.6,3952.76 2712.6,4051.18 2779.53,4118.11 3236.22,4118.11 3425.56,4307.45 U36.4@3450.98,4307.45
  Bottom Layer w8: R76.2@869.86,1523.45 R76.2@874.84,1523.45 903.68,1523.45
  Bottom Layer w10: v2(4948.82,4224.41) 5003.94,4224.41 5035.43,4255.91 5035.43,4377.01 5023.15,4389.29 R181.2@4998.03,4389.29
  Bottom Layer w12: C35.1@9371.02,2922.46 9418.56,2970 v1@9466,2970 ; C37.1@9465.68,4061.97 9515.75,4011.9 v1(9515.75,3956.7) ; C40.1@9468.5,3236.22 9468.5,3237.2 v1(9468.5,3267.72) ; v1(9468.5,3622.05) 9468.5,3653.27 C44.1@9468.5,3653.54 ; C47.1@9476.38,3003.35 v1(9476.38,2972.44) v1(9515.75,2933.07) C50.1@9547.24,2933.07 ; C53.1@9476.38,3885.83 v1(9476.38,3917.32) v1(9515.75,3956.7) ; C45.1@9546.65,3956.7 v1(9515.75,3956.7) ; C52.1@9779.53,2925.2 9779.8,2925.2 v1(9811.02,2925.2) ; C41.1@9784.13,3963.98 v1(9784.13,3993.02) ; v1(10165.35,2925.2) 10196.18,2925.2 C42.1@10196.85,2925.2 ; C38.1@10196.18,3965.16 v1(10196.18,3994.2) ; C46.1@10429.13,3956.69 v1(10460.63,3956.7) ; C43.1@10429.73,2933.07 v1(10460.63,2933.07) v1(10500,2972.44) ; C48.1@10500,3003.94 v1(10500,2972.44) ; C49.1@10500,3886.42 v1(10500,3917.32) v1(10460.63,3956.7) ; C51.1@10507.88,3236.22 10507.88,3236.5 v1(10507.87,3267.32) ; v1(10507.87,3622.05) 10507.87,3652.87 C39.1@10507.87,3653.54 ; C36.1@10516.27,4056.41 10460.63,4000.76 v1(10460.63,3956.7) ; 10569.25,4300.43 R13.1@10599.28,4300.43 ; 10569.28,4212.6 R14.1@10599.28,4212.6 ; C34.1@10599.79,2916.9 10544.25,2972.44 v1(10500,2972.44)
  Bottom Layer w15.75: C47.1@9476.38,3003.36 C47.1@9476.38,3003.94 ; C45.1@9546.67,3956.7 C45.1@9547.24,3956.7 ; C43.1@10429.14,2933.07 C43.1@10429.71,2933.07 ; C49.1@10500,3885.83 C49.1@10500,3886.4
  Bottom Layer w19.68: TP11.1@10514.94,5281.97 10565,5231.91 10565,4124.77 C36.1@10523.23,4083 ; TP11.1@10514.94,5285.97 TP11.1@10516.94,5283.97
  Bottom Layer w39.37: U15.4@768.68,1771.52 855.61,1771.52 ; R168.1@2234.25,3716.54 v1(2234.25,3771.65) v1(2234.25,3799.21) v1(2234.25,3824.8) ; R169.1@2746.06,3923.23 v1(2746.06,3978.35) v1(2746.06,4005.91) v1(2746.06,4031.5)
  Bottom Layer w49.21: R170.1@728.35,3204.72 v2(728.35,3255.91) v2(728.35,3283.46) v2@728.35,3303.15
  Bottom Layer w50: 855.61,1771.52 v2(883.68,1743.45)
  Bottom Layer w75: 883.68,1728.45 v2(883.68,1713.45) v2(883.68,1683.45) v2(883.68,1653.45) v2(883.68,1623.45) 899.18,1607.95 924.73,1582.41 ; 912.74,1269.2 D7.1@895.57,1252.03 ; 929.68,1566 933.68,1566.02 ; 933.68,1582.41 933.68,1566.02 ; C164.1@1023.97,1566.41 933.68,1566.02 ; D7.1@895.57,1252.03 D7.1@863.68,1220.15 D7.1@895.57,1252.03 ; D7.1@895.57,1252.03 933.68,1290.15 933.68,1413.45 933.68,1566.02
  other v1: 9431,3901 9422,3931 9449.5,3961 9491.1,3981.2 9464.1,3985 9440.7,3993.3
  other v2: 884.68,1593.45
2V5D: C258.2 R181.1 R186.2 U49.10 | length 1407.6
  Bottom Layer w7.87: U49.10@4039.37,4508.46 4113.58,4508.46 4141.73,4480.31 4141.73,4320 4196.73,4265 4394.92,4265 4523.62,4393.7 4547.24,4393.7 4685.04,4255.91 4982.28,4255.91 4997.05,4270.67 C258.2@4997.05,4303.15 R181.1@4997.05,4345.94 ; R186.2@4955.22,4389.29 4955.67,4389.29 R181.1@4998.03,4346.93 R181.1@4998.03,4349.92